# Altium PCB WorkingPoactuatorPCB.PcbDoc (part 2 of 2)
Units mil, origin at the board's own origin, x right, y up, seen from the top; angles counter-clockwise.
Board outline 7000 x 5000 mil, 2 copper layers (Top Layer, Bottom Layer), stack 64.961 mil thick; 132 components, 96 nets, 510 pads, 131 vias.
Unrouted connection lines stored in the file: 22.
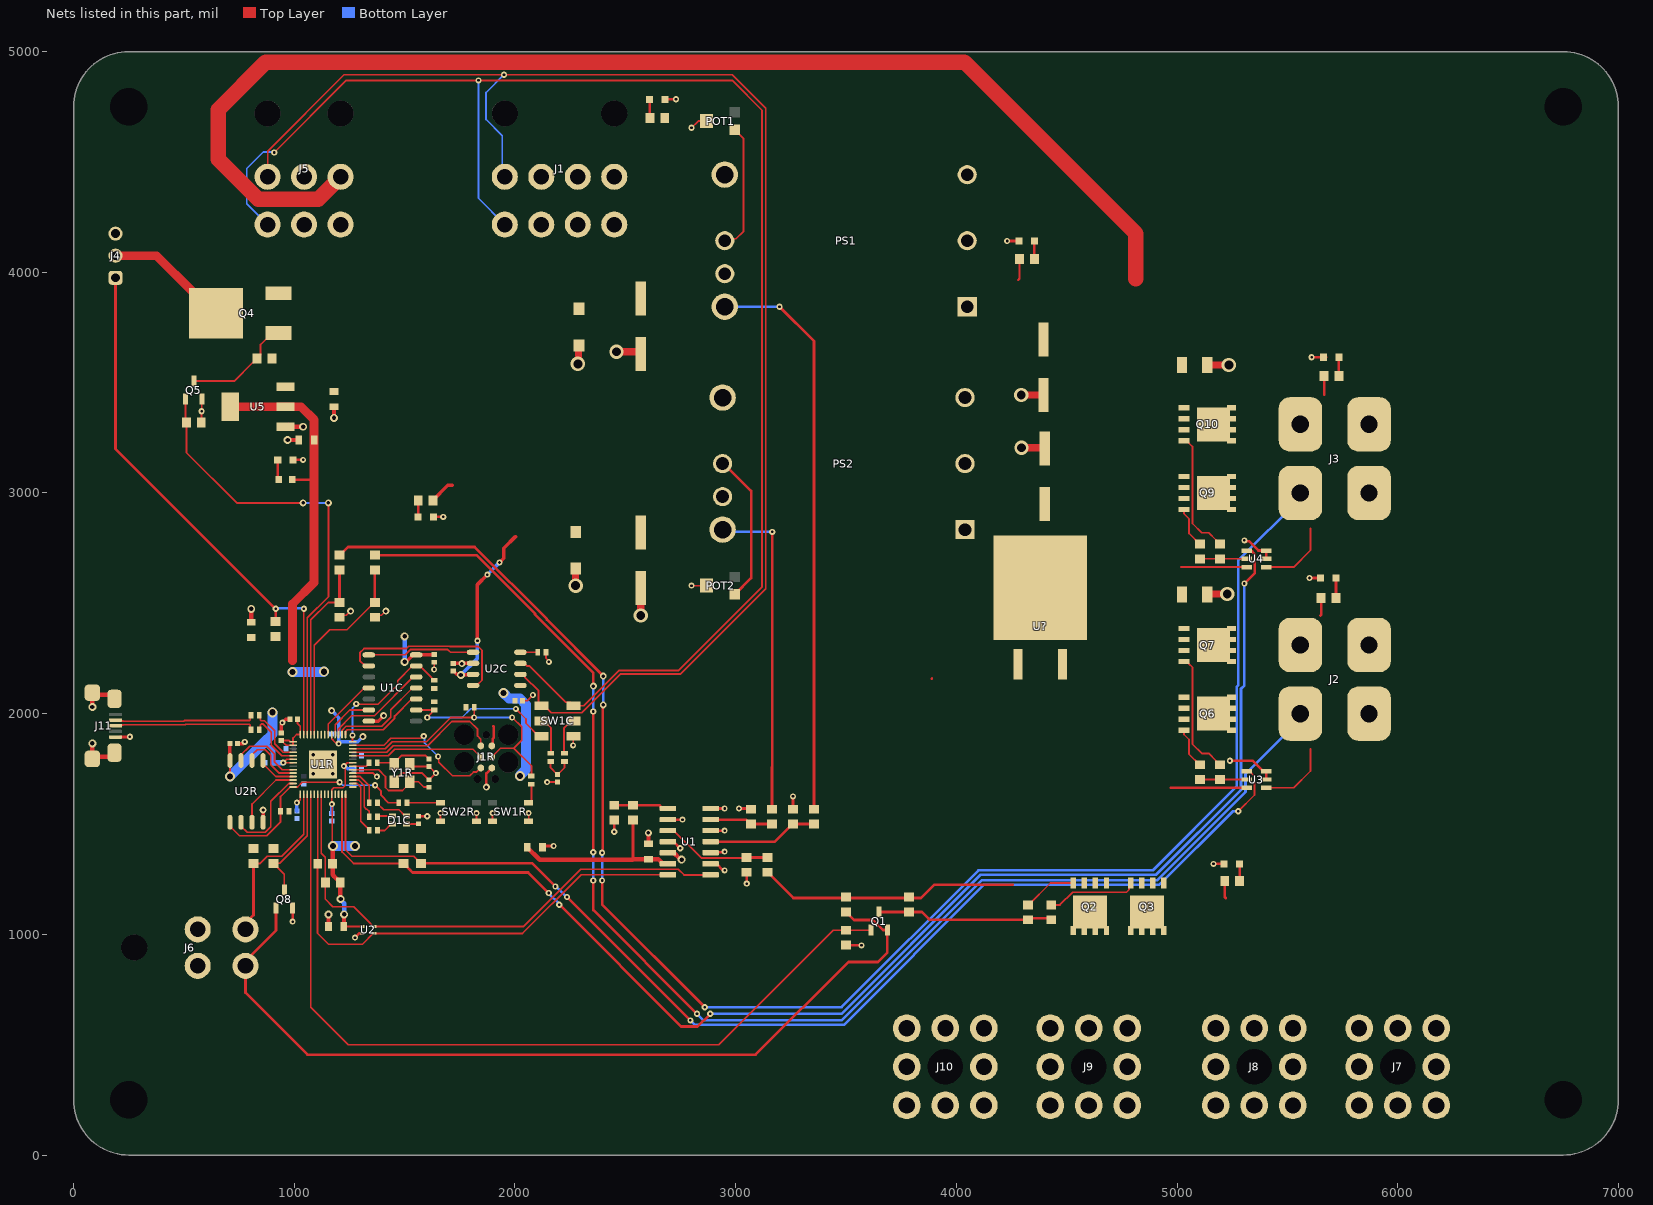
[diagram p2: the nets of this part, all layers, seen from the top]

## Via types
v1: diameter 28, hole 12, Top Layer to Bottom Layer, tented both sides, 52 vias
v2: diameter 27.56, hole 11.81, Top Layer to Bottom Layer, tented both sides, 32 vias
v3: diameter 31.5, hole 15.75, Top Layer to Bottom Layer, tented both sides, 18 vias
v4: diameter 36, hole 20, Top Layer to Bottom Layer, tented both sides, 13 vias
v5: diameter 45.28, hole 27.56, Top Layer to Bottom Layer, tented both sides, 8 vias
v6: diameter 65, hole 40, Top Layer to Bottom Layer, tented both sides, 8 vias

## Nets (pads, with @x,y where several pads share a name; then routed paths per layer and width w, separated by ;. In a path a pad name is that pad's centre, name@x,y a point inside that pad or via, vN(x,y) a via of type N, cw(c..) or ccw(c..) an arc to the next point about the centre after c; other vN are vias at no path point) (continued)
3V3: C1.1 C1C.1 C2.1 C3C.1 C3R.1 C4R.1 C5C.1 C5R.1 C6R.1 C7R.1 C8R.1 C9R.1 C10R.1 C12.1 C13.1 C14.1 D1C.4 J1R.2 R1.1 R1C.1 R4C.1 R4R.1 R5R.1 R9.1 R13.1 R14.1 R15.1 R19.1 R30.1 R35.1 R36.1 U1.6 U1C.14 U1R.1 U1R.10 U1R.22 U1R.33 U1R.42 U1R.43 U1R.44 U1R.48 U1R.49 U2.3 U2C.5 U2R.8 U5.2 U5.4 | length 6091.4
  Top Layer w7.87: C4R.1@941.02,1878.86 C4R.1@941.81,1878.86 ; U1R.49@994.67,1777.87 v2(949.88,1777.87) 965.63,1793.62 U1R.48@994.67,1793.62 ; v2(1011.89,1596.77) 1014.78,1596.77 1027.64,1609.63 U1R.1@1027.64,1634.67 ; C10R.1@1015,1975 1015,1955 1027.64,1942.36 U1R.42@1027.64,1905.33 1010.33,1905.33 994.67,1889.67 U1R.43@994.67,1872.36 ; U1R.33@1169.37,1905.33 1169.37,1885.52 1186.64,1868.25 1197.1,1868.25 v2(1200.87,1864.49) ; v5(1175,1400) 1172.5,1402.5 1172.5,1587.5 v2(1170,1590) 1169.37,1590.63 U1R.10@1169.37,1634.67 1169.37,1654.48 1178.6,1663.7 1194.84,1663.7 1220.55,1663.7 1231.03,1674.18 1231.03,1750.26 1224.49,1756.8 v2(1224.49,1762.13) 1240.24,1777.87 U1R.22@1265.33,1777.87 ; C1C.1@1633.44,2266.95 C1C.1@1633.94,2267.44 ; C4R.1@941.81,1878.86 948.9,1871.77 948.9,1870.98 963.27,1856.61 U1R.44@994.67,1856.61 U1R.43@994.67,1872.36 ; C4R.1@941.81,1878.86 974.88,1878.86 981.38,1872.36 U1R.43@994.67,1872.36
  Top Layer w8: v5@1155,1400 v5@1160,1395
  Top Layer w9.84: v5(708.54,1714.88) U2R.8@708.54,1787.66 ; v5(1135,2190) v5@1136.06,2191.06 ; D1C.4@1507.95,1500.32 1508.25,1500.61 1560.66,1500.61 C5C.1@1563.07,1498.2
  Top Layer w10: C2.1@1225,1035 1225.75,1035.75 U2.3@1307.44,1035.75 ; C5C.1@1563.07,1498.2 C5C.1@1563.07,1500.33
  Top Layer w11.81: J1R.2@1895.16,1853.86 1898.83,1857.53 1898.83,1885.29 1903.56,1890.02 1903.56,1941.32 1901.65,1943.23
  Top Layer w12: 993.5,3060 1090,3060 ; 2535,1340 R19.1@2535,1518
  Top Layer w15.75: U2R.8@708.54,1787.66 C3R.1@708.54,1864.49 ; v4(1500,2235) 1507.27,2235 1538.73,2266.46 U1C.14@1552.24,2266.46 ; U1C.14@1552.74,2266.95 C1C.1@1633.44,2266.95
  Top Layer w20: v5@1170,1390 1173.5,1386.5 R13.1@1173.5,1320 1173.5,1270.78 1179.37,1264.9 1179.37,1264.13 1196,1247.5 1198.5,1247.5 1208.5,1237.5 R14.1@1208.5,1235 1209.25,1234.25 1209.25,1160.75 v4(1210,1160) ; C2.1@1225.38,1036.12 1225.38,1089.75 v4(1225.75,1090.13) ; C13.1@2055,1395 2111.87,1338.13 2533.13,1338.13 2535,1340 C1.1@2605,1340 2650,1340 2665.94,1324.06 2665.94,1321.81 2667.76,1320 U1.6@2693.35,1320
  Top Layer w40: U5.4@710,3390.59 U5.2@960,3390.59 1030.59,3390.59 1090,3331.17 C12.1@1090,3240 1090,3060 1090,2595 991.97,2496.97 991.97,2240
  Bottom Layer w15.75: C7R.1@1011.89,1558.78 v2(1011.89,1596.77) ; C6R.1@1169.37,1547.13 1169.69,1547.44 1169.69,1589.69 v2(1170,1590) ; v3(1169.37,2014.09) 1202.24,1981.22 C9R.1@1202.24,1907.8 1201.56,1907.11 v2@1201.56,1872.36 ; v2(1200.87,1864.49) 1208.74,1872.36 1251.23,1872.36 1251.63,1871.97 1287.09,1871.97 v3(1311.1,1895.98) ; v2(1224.49,1762.13) 1229.82,1762.13 1241.73,1750.21 C8R.1@1270.35,1750.21
  Bottom Layer w20: v4(1210,1160) 1210,1156.03 1225.75,1140.28 v4(1225.75,1090.13) v4@1225.75,1086.76 ; v4(1500,2235) v4(1500,2350)
  Bottom Layer w23.62: 864.15,1870.49 903.03,1831.61 C5R.1@903.03,1777.87 v2(949.88,1777.87)
  Bottom Layer w45.28: v5(708.54,1714.88) 864.15,1870.49 901.65,1907.99 v5(901.65,2006.22) ; v5(991.97,2188.19) 1133.19,2188.19 v5(1135,2190) ; v5(1175,1400) v5(1275,1400) ; v5(1948.9,2092.83) 1972.72,2069.02 2022.36,2069.02 2049.3,2042.08 2049.3,1746.08 2021.97,1718.75 v5(2021.97,1718.19)
3V3_MEAS: R19.2 R23.1 U1.1 | length 250.7
  Top Layer w12: R23.1@2450,1585 R19.2@2535,1585 ; R19.2@2535.16,1585 2654.92,1585 2661.94,1577.97 2661.94,1575.81 2667.76,1570 U1.1@2693.35,1570
5V: C4C.1 C8.1 C9.1 C11.1 J1.6 J5.5 PS2.7 PS2.8 Q4.2 R3.1 R18.1 R24.1 U2C.3 U5.3 | length 2414.3
  Top Layer w12: R18.1@3165,1565.82 R18.1@3165,1567 3165,1757.85 3165.93,1758.78 v1(3165.93,2823.82)
  Top Layer w15.75: R3.1@1628.5,2965 1628.5,2967.5 1696,3035 1715,3035 ; C4C.1@1720.55,2193.82 1723.7,2190.67 1724.49,2190.67 1736.28,2178.88 1751.12,2178.88 v4(1755,2175) 1756.56,2176.56 1808.61,2176.56 U2C.3@1810.12,2178.07 ; v1(1830,2330) 1830,2585 v1(1875,2630) ; v1(1930,2685) 1950,2705 1950,2750 2002.66,2802.66
  Bottom Layer w12: PS2.8@2955.79,2823.82 v1(3165.93,2823.82)
  Bottom Layer w15.75: v4(1755,2175) 1830,2250 v1(1830,2330) ; v1(1875,2630) v1(1930,2685)
5V_MEAS: R18.2 R22.1 U1.13 | length 286.6
  Top Layer w12: U1.13@2886.65,1520 3047.5,1520 3067.5,1500 R22.1@3070,1500 R18.2@3165,1500
15V: C4.1 C5.1 J1.7 J1.8 J5.6 PS1.7 PS1.8 R2.1 R17.1 | length 2587.1
  Top Layer w12: v1(3198.82,3843.82) 3355,3687.64 R17.1@3355,1569.4
  Bottom Layer w12: PS1.8@2950.79,3843.82 v1(3198.82,3843.82)
15V_MEAS: R17.2 R21.1 U1.11 | length 501.5
  Top Layer w12: U1.11@2886.65,1420 3177.5,1420 3257.5,1500 R21.1@3260,1500 R17.2@3355,1500
AUX_SWITCH: J6.4 R15.2 U1R.2 | length 778.1
  Top Layer w7.87: J6.4@778.94,1022.68 J6.4@778.94,1050.77 ; R15.2@815,1321.5 845.8,1321.5 870.69,1346.39 877.61,1353.31 943.31,1353.31 1043.39,1453.39 U1R.2@1043.39,1634.67
  Top Layer w12: J6.4@778.94,1050.77 815,1086.83 R15.2@815,1321.5
CANCLK_RP2CAN: U1C.6 U1R.32 | length 224.8
  Top Layer w7.87: U1R.32@1185.12,1905.33 1185.12,1950.12 1251.46,2016.46 U1C.6@1337.68,2016.46
CANH: J1.5 J5.4 SW1C.4 U2C.7 | length 7110.8
  Top Layer w8: v1(909.35,4542.76) 1235.97,4869.38 2983.81,4869.38 3119.94,4733.25 3119.94,2574.94 2740,2195 2470.6,2195 2311.35,2035.75 SW1C.4@2265.83,2035.75 2250.08,2051.5 2229.8,2051.5 2064.98,2216.32 2053.9,2216.32 2042.16,2228.07 U2C.7@2024.68,2228.07
  Bottom Layer w8: J5.4@879.29,4216.06 785,4310.35 785,4470 860,4545 907.11,4545 v1(909.35,4542.76) ; v1(1835,4869.38) 1835,4335 J1.5@1953.94,4216.06
CANL: J1.1 J5.1 SW1C.1 U2C.6 | length 6739.2
  Top Layer w8: J5.1@879.29,4432.6 879.29,4549.29 1225.25,4895.25 v1(1950,4895.25) ; v1@1950.25,4895.25 2984.75,4895.25 3136.79,4743.21 3136.79,2566.79 2749.13,2179.13 2477.18,2179.13 2302.24,2004.19 2163.53,2004.19 2131.97,2035.75 SW1C.1@2120.16,2035.75 ; U2C.6@2024.68,2178.07 2037.19,2178.07 2044.41,2170.85 2044.41,2165.72 2106.95,2103.18 2106.95,2049.62 SW1C.1@2120.16,2036.41
  Bottom Layer w7.87: v1(1950,4895.25) 1869.14,4814.4 1869.14,4692.03 1942.14,4619.04 1942.14,4444.4 J1.1@1953.94,4432.6
CANRX_RP2CAN: U1C.2 U2C.4 | length 845.6
  Top Layer w7.87: U1C.2@1337.68,2216.46 1320.94,2216.46 1297.32,2240.08 1297.32,2276.24 1316.27,2295.19 1508.57,2295.19 1519.4,2306.02 1702.09,2306.02 1703.93,2304.19 1834.14,2304.19 1850.47,2287.86 1850.47,2151.69 1826.85,2128.07 U2C.4@1810.12,2128.07
CANTX_RP2CAN: U1C.1 U2C.1 | length 487.4
  Top Layer w7.87: U1C.1@1337.68,2266.46 1502.11,2266.46 1525.92,2290.28 1695.57,2290.28 1707.77,2278.07 U2C.1@1810.12,2278.07
DBG_TX_RP2040: J1R.5 U1R.27 | length 714.8
  Top Layer w7.87: U1R.27@1265.33,1856.61 1406.33,1856.61 1437.82,1888.11 1572.24,1888.11 1582.08,1897.95 v2(1586.69,1897.95) ; v2(1651.65,1805.8) 1654.8,1802.66 1654.8,1780.63 1717.01,1718.42 1795.19,1718.42 1812.07,1735.3 1825.1,1735.3 1843.66,1753.86 J1R.5@1845.16,1753.86
  Bottom Layer w7.87: v2(1586.69,1897.95) 1590.42,1894.22 1590.42,1867.04 v2(1651.65,1805.8)
FAN_PWR: J4.2 Q4.3 | length 639.2
  Top Layer w40: J4.2@190,4075 375.5,4075 541.5,3909 543.5,3909 601.5,3851 601.5,3849 Q4.3@695.5,3755
FAN_SWITCH: Q5.1 R29.1 U1R.40 | length 2074.1
  Top Layer w7.87: U1R.40@1059.13,1905.33 1059.13,2434.13 1155,2530 v3(1155,2955) v3@1155,2957.85
  Top Layer w8: Q5.1@507.5,3425 507.5,3324 R29.1@511.5,3320 511.5,3182.5 739,2955 v3(1040,2955)
  Bottom Layer w8: v3(1040,2955) v3(1155,2955)
FAN_TACH: J4.1 R30.2 U1R.41 | length 2561.3
  Top Layer w7.87: U1R.41@1043.39,1905.33 1043.39,2396.82 v1(1043.39,2475) v1@1043.39,2478.39
  Top Layer w12: J4.1@190,3975 190,3200 v1@915.46,2474.54 ; R30.2@915,2417 915.92,2417.92 v1(915.92,2475)
  Bottom Layer w12: v1(915.92,2475) 918.42,2477.5 1042.5,2477.5 v1@1043.39,2478.39
GND: C1.2 C1C.2 C1R.2 C2.2 C2C.1 C2R.2 C3.2 C3C.2 C3R.2 C4.2 C4C.2 C4R.2 C5.2 C5C.2 C5R.2 C6.2 C6R.2 C7.2 C7R.2 C8.2 C8R.2 C9.2 C9R.2 C10.2 C10R.2 C11.2 C11R.2 C12.2 C12R.2 C13.2 C13R.2 C14.2 D1.2 D2.2 D3.2 D4.2 D5.2 D6.2 D7.2 J1.2 J1.3 J1.4 J1R.6 J2.3 J2.4 J3.3 J3.4 J4.3 J5.2 J6.1 J6.2 J9.1 J10.1 J11.5 J11.6 J11.7 J11.8 J11.9 POT1.2 POT2.2 PS1.2 PS1.3 PS1.4 PS2.2 PS2.3 PS2.4 Q5.2 Q8.2 R6C.2 R8.1 R20.2 R21.2 R22.2 R23.2 R27.2 R28.2 R29.2 SW1C.6 SW1R.B1 SW1R.B2 SW2R.B1 SW2R.B2 U1.2 U1.4 U1.5 U1.9 U1.10 U1.12 U1.14 U1C.7 U1R.19 U1R.57 U2.4 U2C.2 U2R.4 U3.2 U3.3 U4.2 U4.3 U5.1 Y1R.2 Y1R.4 | length 4872.8
  Top Layer w7.87: v3(1173.31,1726.69) U1R.57@1177.24,1730.63 ; U1R.19@1265.33,1730.63 1358.35,1730.63 v2(1374.09,1714.88) ; SW2R.B1@1662.48,1512.13 v2(1662.48,1549.53) ; SW2R.B2@1825.87,1512.13 v2(1825.87,1549.53) ; SW1R.B1@1898.58,1515.87 1898.7,1515.98 v2(1898.7,1549.53) ; C3C.2@2034.09,2058.19 2034.56,2058.65 2056.45,2058.65 2081.29,2083.5 v2(2081.29,2084.34) ; SW1R.B2@2062.09,1512.13 v2(2062.09,1549.53) ; R6C.2@2140.83,2278.07 2140.83,2251.5 2153.62,2238.7 v2(2153.62,2234.57) ; v2(2145.75,1689.88) C2C.1@2192.99,1689.88 ; v2(2263.86,1856.61) 2263.86,1895.98 SW1C.6@2265.83,1897.95 ; v1(2800,2580) POT2.2@2867.91,2580 ; v1(2800,4655) 2830,4685 POT1.2@2867.91,4685
  Top Layer w8: v1(580,3370) 581.25,3371.25 581.25,3423.75 Q5.2@582.5,3425 ; U5.1@974.69,3314.72 U5.1@989.41,3300 ; R28.2@1205,2436.5 1213.88,2445.38 1235.38,2445.38 v3(1255,2465) ; R27.2@1365,2436.5 1373.88,2445.38 1395.38,2445.38 v3(1415,2465) ; Y1R.4@1453.7,1691.26 1453.7,1697.17 1487.23,1730.69 1579.35,1730.69 1609.53,1700.51 C1R.2@1610.32,1700.51 1611.1,1700.51 v2@1641.22,1730.63 ; Y1R.2@1523.7,1771.26 1534.21,1760.75 C2R.2@1610.32,1760.75 1611.1,1760.75 v2@1641.22,1730.63 ; v2(1633.94,2200.32) C1C.2@1633.94,2233.19 C1C.2@1633.94,2235.32 ; v2(1641.81,1730.63) v2@1641.22,1730.63 ; SW1R.B1@1898.58,1515.87 SW1R.B1@1901.26,1513.19 ; U3.2@5405,1701.5 U3.2@5405.75,1700.75 ; U4.2@5405,2701.5 U4.2@5405.75,2700.75
  Top Layer w9.84: C5C.2@1563.07,1535.16 v2(1602.44,1535.16)
  Top Layer w10: R29.2@578.5,3320 580,3321.5 v1(580,3370)
  Top Layer w11.81: v3(1870.24,1667.32) 1870.24,1728.94 J1R.6@1895.16,1753.86
  Top Layer w12: J11.5@210.32,1893.82 210.91,1894.41 254.41,1894.41 v1(255,1895) ; v1(992.5,1057.5) Q8.2@992.5,1119 ; D1.2@995,3150 v1(1040,3150) ; v1(1275,985) 1294.25,1004.25 U2.4@1307.44,1004.25 ; D2.2@1625,2891.54 D2.2@1631.5,2891.54 v1(1675,2891.54) ; C13.2@2125,1400 v1(2175,1400) ; v1(2450,1465) R23.2@2450,1518 ; D3.2@2680,4783.72 v1(2730,4783.72) ; U1.5@2693.35,1370 U1.5@2718.94,1370 ; U1.4@2693.35,1420 2718.94,1420 v1(2748.94,1390) ; U1.2@2693.35,1520 v1@2755,1520 ; U1.9@2886.65,1320 2912.24,1320 2942.24,1290 v1@2945,1290 ; U1.10@2886.65,1370 2889.15,1372.5 2947.5,1372.5 v1(2950,1375) ; U1.12@2886.65,1470 v1(2950,1470) ; U1.14@2886.65,1570 v1(2950,1570) ; v1(3015,1570) 3067,1570 R22.2@3070,1567 ; v1(3050,1230) R20.2@3050,1281.5 ; R21.2@3260,1567 v1(3260,1625) ; R8.1@3500,951.5 3501.5,950 v1(3570,950) ; v1(4230,4141.92) D4.2@4280,4141.92 ; v1(5165,1319.1) D7.2@5213.5,1319.1 D7.2@5215,1319.1 ; v1(5239.37,1786.94) 5342.96,1786.94 5390.45,1739.45 U3.3@5405,1739.45 ; v1(5305,2785) 5308.06,2781.94 5325.58,2781.94 5368.07,2739.45 U4.3@5405,2739.45 ; U3.2@5405,1701.5 U3.3@5405,1738.9 ; U4.2@5405,2701.5 U4.3@5405,2738.9 ; v1(5600,2615) D6.2@5650.03,2615 ; v1(5610,3615) D5.2@5663.5,3615 D5.2@5675,3615
  Top Layer w15.75: C3R.2@742.8,1864.49 767.8,1864.49 v2(775.67,1872.36) ; U2R.4@858.54,1508.13 v3(858.54,1563.41) ; C4R.2@941.02,1913.11 941.02,1950.86 945.94,1955.78 v2(945.94,1958.98) 961.69,1974.72 980.47,1974.72 C10R.2@980.75,1975 ; U1C.7@1337.68,1966.46 1380.52,1966.46 v3(1405.06,1991) ; C4C.2@1720.55,2228.07 1721.24,2227.38 1759.23,2227.38 v3(1759.92,2226.69) 1760.61,2227.38 1809.43,2227.38 U2C.2@1810.12,2228.07
  Top Layer w20: J11.8@85,1795.39 v4(85,1865) ; v4(85,2030) 85,2074.61 95.39,2085 167.44,2085 J11.6@185.39,2067.05 ; J11.8@105,1795.39 105,1800.15 109.85,1805 167.44,1805 J11.7@185.39,1822.95 ; C14.2@805,2415 v4(805,2475) ; v4(970,3240) C12.2@1020,3240 ; U5.1@989.42,3300.02 v4(1040,3300) ; C2.2@1155,1035 v4(1155,1090) ; v4(1180,3340) C11.2@1180,3390 ; C1.2@2605,1410 v3(2605,1460) ; U1.5@2718.94,1370 2747.33,1341.61 2751.88,1341.61 v4@2754.94,1338.55
  Top Layer w32: v6(2275,2580) C8.2@2275,2657 ; v6(2285,3585) 2287.5,3587.5 2287.5,3658.5 C4.2@2290,3661 ; v6(2460,3640) C5.2@2570,3640 ; v6(2570,2445) C9.2@2570,2569 ; v6(4294,3444) C3.2@4395,3444 ; v6(4295,3205) 4396,3205 C7.2@4400,3201 ; C6.2@5134.35,2542.5 v6(5227.5,2542.5) ; C10.2@5137.48,3580 v6(5235,3580)
  other v1: 2950,1290 2759,1520
  other v3: 1086.69,1726.69 1086.69,1813.31 1173.31,1813.31
  other v4: 2755,1338.55
INT_RP2CAN: U1C.4 U1R.34 | length 297.2
  Top Layer w7.87: U1R.34@1153.62,1907.8 1153.62,1953.4 1316.68,2116.46 U1C.4@1337.68,2116.46
KILL_SWITCH: J6.3 Q1.2 Q8.1 R37.2 | length 3980.2
  Top Layer w12: Q8.1@917.5,1119 917.5,1017.5 778.94,878.94 J6.3@778.94,857.32 778.94,736.06 1060,455 3091,455 3511,875 3644.63,875 3687.63,918 3687.63,1019.37 3667.75,1019.37 3622.12,1065 3536.5,1065 R37.2@3500,1101.5
LEDB_RP2CAN: R8C.1 U1R.18 | length 168.1
  Top Layer w7.87: U1R.18@1265.33,1714.88 1298.19,1714.88 1339.65,1673.43 R8C.1@1339.65,1596.77
LEDG_RP2CAN: R7C.1 U1R.17 | length 213.3
  Top Layer w7.87: U1R.17@1265.33,1699.13 1291.67,1699.13 1317.01,1673.79 1317.01,1577.12 1326.86,1567.26 1329.79,1567.26 1339.65,1557.4 R7C.1@1339.65,1533.78
LEDR_RP2CAN: R5C.1 U1R.16 | length 255
  Top Layer w7.87: U1R.16@1265.33,1683.39 1285.14,1683.39 1301.26,1667.27 1301.26,1513.11 1339.65,1474.72 R5C.1@1339.65,1470.79
MISO_RP2CAN: U1C.12 U1R.31 | length 475
  Top Layer w7.87: U1R.31@1200.87,1905.33 1200.87,1931.67 1259.28,1990.08 1363.4,1990.08 1539.77,2166.46 U1C.12@1552.24,2166.46
MOSI_RP2CAN: U1C.11 U1R.30 | length 454.6
  Top Layer w7.87: U1R.30@1216.61,1905.33 1216.61,1925.14 1234.3,1942.83 1395.87,1942.83 1437.09,1984.05 1437.09,2018.03 1535.51,2116.46 U1C.11@1552.24,2116.46
MOTOR_EN: Q1.3 R10.2 R11.1 R12.1 | length 799.9
  Top Layer w12: Q1.3@3650,1101.5 R10.2@3785,1101.5 3843.5,1101.5 3878.5,1066.5 R11.1@4325,1066.5 4331.5,1073 4423.5,1073 R12.1@4430,1066.5
MOTOR_PWR: J7.1 J8.1 Q2.D Q3.D R7.1 | length 77.3
  Top Layer w12: R7.1@5216.5,1240.9 5216.5,1168.5 5220,1165
nCS_RP2CAN: R4C.2 U1C.13 U1R.28 | length 646.2
  Top Layer w7.87: v2(1263.86,1901.5) 1263.86,1872.36 U1R.28@1265.33,1872.36 ; v2(1280.81,2044.39) 1282.36,2042.83 1379.21,2042.83 1468.32,2131.94 1468.32,2149.27 1535.51,2216.46 U1C.13@1552.24,2216.46 1568.98,2216.46 1623.11,2162.32 1623.11,2157.8 1630,2150.91 R4C.2@1633.94,2150.91
  Bottom Layer w7.87: v2(1263.86,1901.5) 1263.86,2025.15 1280.81,2042.1 v2(1280.81,2044.39)
NetC2C_2: C2C.2 R2C.2 R3C.2 | length 144.3
  Top Layer w7.87: R2C.2@2161.5,1782.8 2161.5,1754.84 2192.2,1724.13 C2C.2@2192.99,1724.13 2193.78,1724.13 2224.49,1754.84 R3C.2@2224.49,1782.8
NetC2R_1: C2R.1 R1R.2 Y1R.3 | length 263.4
  Top Layer w8: R1R.2@1375.99,1777.87 1447.09,1777.87 Y1R.3@1453.7,1771.26 1453.7,1777.17 1487.23,1810.69 1593.83,1810.69 1609.53,1795 C2R.1@1610.32,1795
NetD1_1: D1.1 R1.2 | length 90.6
  Top Layer w12: D1.1@925,3150 925,3061.5 926.5,3060
NetD1C_1: D1C.1 R5C.2 | length 80.1
  Top Layer w7.87: R5C.2@1377.05,1470.79 1410.51,1470.79 1440.04,1500.32 D1C.1@1444.96,1500.32
NetD1C_2: D1C.2 R7C.2 | length 68.7
  Top Layer w7.87: R7C.2@1377.05,1533.78 1379.02,1535.75 D1C.2@1444.96,1535.75
NetD1C_3: D1C.3 R8C.2 | length 158.5
  Top Layer w7.87: R8C.2@1377.05,1596.77 1377.05,1592.83 1405.59,1564.29 1474.49,1564.29 1503.03,1535.75 D1C.3@1507.95,1535.75
NetD2_1: D2.1 R3.2 | length 73.5
  Top Layer w12: D2.1@1561.5,2891.54 R3.2@1561.5,2965
NetD3_1: D3.1 R2.2 | length 74.3
  Top Layer w8: R2.2@2610,4711.5 R2.2@2611.5,4710
  Top Layer w12: R2.2@2610,4711.5 D3.1@2610,4783.72
NetD4_1: D4.1 R4.2 | length 81.9
  Top Layer w12: R4.2@4353.5,4060 D4.1@4353.5,4141.92
NetD5_1: D5.1 R5.2 | length 85
  Top Layer w12: R5.2@5733.5,3530 D5.1@5733.5,3615
NetD6_1: D6.1 R6.2 | length 90
  Top Layer w12: R6.2@5720.03,2525 D6.1@5720.03,2615
NetD7_1: D7.1 R7.2 | length 78.2
  Top Layer w12: R7.2@5283.5,1240.9 D7.1@5283.5,1319.1
NetPOT1_1: POT1.1 PS1.6 | length 579.2
  Top Layer w7.87: POT1.1@2995.87,4645.63 3035.87,4605.63 3035.87,4570
  Top Layer w8: PS1.6@2950.79,4143.03 2959.26,4151.51 3001.51,4151.51 3035.87,4185.87 3035.87,4570
NetPOT2_1: POT2.1 PS2.6 | length 660.4
  Top Layer w12: PS2.6@2955.79,3123.03 3070,3008.82 3070,2614.76 POT2.1@2995.87,2540.63
NetQ2_4: Q2.4 R11.2 | length 246
  Top Layer w8: R11.2@4325,1133.5 4327.5,1133.5 4426.5,1232.5 Q2.4@4530,1232.5
NetQ3_4: Q3.4 R12.2 | length 414.2
  Top Layer w8: R12.2@4430,1133.5 4469.21,1133.5 4526.89,1191.19 4771.19,1191.19 4782.26,1202.26 4782.26,1224.76 Q3.4@4790,1232.5
NetQ4_1: Q4.1 Q5.3 R24.2 | length 501.5
  Top Layer w8: Q5.3@545,3507 728.5,3507 813,3591.5 815.5,3591.5 831.5,3607.5 R24.2@831.5,3610 847.5,3626 847.5,3672.5 900,3725 Q4.1@927.5,3725
NetQ6_4: Q6.4 R31.1 | length 185.2
  Top Layer w8: Q6.4@5031.44,1924.3 5031.44,1905.68 5054.13,1883 5054.13,1816.87 R31.1@5102.5,1768.5
NetQ7_4: Q7.4 R32.1 | length 510.7
  Top Layer w8: Q7.4@5053.5,2228.02 5053.5,2226.5 5070,2210 5070,1861.51 5111.51,1820 5143.5,1820 R32.1@5176.5,1787
NetQ9_4: Q9.4 R33.1 | length 188.7
  Top Layer w8: Q9.4@5030.75,2925 5031.44,2924.3 5031.44,2905.68 5054.13,2883 5054.13,2816.87 5102.5,2768.5 R33.1@5105,2768.5
NetQ10_4: Q10.4 R34.1 | length 562.7
  Top Layer w8: Q10.4@5032.5,3236.02 5045.5,3236.02 5053.5,3228.02 5053.5,3226.5 5070,3210 5070,2861.51 5111.51,2820 5143.5,2820 5176.5,2787 5176.5,2784.5 5192.5,2768.5 R34.1@5195,2768.5
NetR2C_1: R2C.1 SW1C.2 | length 172.3
  Top Layer w7.87: SW1C.2@2120.16,1966.85 2131.97,1966.85 2163.46,1935.35 2163.46,1822.17 R2C.1@2161.5,1820.2
NetR3C_1: R3C.1 SW1C.5 | length 172.3
  Top Layer w7.87: R3C.1@2224.49,1820.2 2222.52,1822.17 2222.52,1935.35 2254.02,1966.85 SW1C.5@2265.83,1966.85
NetR6C_1: R6C.1 U2C.8 | length 78.7
  Top Layer w7.87: U2C.8@2024.68,2278.07 R6C.1@2103.43,2278.07
NetR6R_1: R6R.1 SW1R.A2 | length 91.3
  Top Layer w7.87: SW1R.A2@2062.09,1596.77 2066.02,1596.77 2074.88,1605.63 R6R.1@2074.88,1680.43
NetR7R_1: R7R.1 SW2R.A1 | length 151.6
  Top Layer w7.87: R7R.1@1510.91,1596.77 SW2R.A1@1662.48,1596.77
NetR31_2: R31.2 R32.2 U3.5 | length 210
  Top Layer w8: R31.2@5105,1701.5 R32.2@5195,1701.5 U3.5@5315,1701.5
NetR33_2: R33.2 R34.2 U4.5 | length 219.7
  Top Layer w8: R33.2@5105,2701.5 R34.2@5195,2701.5 U4.5@5315,2701.5
  Top Layer w10: R33.2@5098.13,2694.63 R33.2@5105,2701.5
NetU1R_5: U1R.5
NetU1R_8: U1R.8
NetU1R_9: U1R.9
NetU1R_11: U1R.11
NetU1R_12: U1R.12
NetU1R_15: U1R.15
NetU1R_35: U1R.35
NetU1R_36: U1R.36
NetU1R_37: U1R.37
PHYS_KILLSWITCH: Q8.3 R9.2 U1R.3 | length 535.1
  Top Layer w7.87: Q8.3@955,1201 955,1271.5 R9.2@905,1321.5 905.93,1322.43 934.7,1322.43 1059.13,1446.86 U1R.3@1059.13,1634.67
PORT_MEAS: R25.2 R27.1 U1R.38 | length 907.6
  Top Layer w7.87: U1R.38@1090.63,1905.33 1090.63,2310.63 1159.97,2379.97 1238.97,2379.97 1362.5,2503.5 R27.1@1365,2503.5
  Top Layer w12: R27.1@1365,2503.5 R25.2@1365,2651.5
PORT_STAT: R36.2 U1R.14 U3.4 | length 5260.6
  Top Layer w7.87: U1R.14@1232.36,1634.67 1232.36,1382.64 1261.69,1353.31 1540.69,1353.31 1572.5,1321.5 R36.2@1575,1321.5 ; v1(5277.21,1557.79) 5350.81,1631.39 5350.81,1717.09 5329,1738.9 U3.4@5315,1738.9
  Top Layer w12: R36.2@1575,1321.5 2078.5,1321.5 v1(2182.96,1217.04) ; v1(2235.8,1169.2) v1(2795,610)
  Bottom Layer w12: v1(2182.96,1217.04) 2185.46,1217.04 2233.3,1169.2 v1(2235.8,1169.2) ; v1@2795.11,609.89 2795.98,609.89 2815.87,590 3490,590 4125,1225 4920,1225 5252.79,1557.79 v1(5277.21,1557.79)
QSPI_SCLK_RP2040: U1R.52 U2R.6 | length 286.6
  Top Layer w7.87: U2R.6@808.54,1791.65 808.54,1813.31 832.17,1836.93 868.33,1836.93 893.78,1811.48 893.78,1768.82 931.97,1730.63 U1R.52@994.67,1730.63
QSPI_SD0_RP2040: U1R.53 U2R.5 | length 178.4
  Top Layer w7.87: U2R.5@858.54,1791.65 858.54,1773.74 917.4,1714.88 U1R.53@994.67,1714.88
QSPI_SD1_RP2040: U1R.55 U2R.2 | length 427.3
  Top Layer w7.87: U2R.2@758.54,1512.13 758.54,1490.47 786.1,1462.91 798.7,1462.91 798.76,1462.86 868.33,1462.86 893.78,1488.31 893.78,1602.31 974.86,1683.39 U1R.55@994.67,1683.39
QSPI_SD2_RP2040: U1R.54 U2R.3 | length 309.4
  Top Layer w7.87: U2R.3@808.54,1512.13 808.54,1590.28 917.4,1699.13 U1R.54@994.67,1699.13
QSPI_SD3_RP2040: U1R.51 U2R.7 | length 339.2
  Top Layer w7.87: U2R.7@758.54,1791.65 758.54,1813.31 797.91,1852.68 874.85,1852.68 910.02,1817.51 910.02,1781.55 945.19,1746.38 U1R.51@994.67,1746.38
QSPI_SS_RP2040: R5R.2 R7R.2 U1R.56 U2R.1 | length 1007.5
  Top Layer w7.87: U2R.1@708.54,1512.13 708.54,1490.47 751.91,1447.11 874.85,1447.11 938.07,1510.33 R5R.2@938.07,1557.4 938.07,1624.33 U1R.56@981.38,1667.64 ; U1R.56@994.67,1667.64 1014.48,1667.64 1036.13,1689.29 v2(1205.44,1689.29) ; v2(1366.22,1675.51) 1393.35,1648.39 1393.35,1629.97 1426.55,1596.77 R7R.2@1473.5,1596.77
  Bottom Layer w7.87: v2(1205.44,1689.29) 1206.12,1689.29 1219.9,1675.51 v2(1366.22,1675.51)
RUN_RP2040: J1R.4 R4R.2 R6R.2 U1R.26 | length 1275.3
  Top Layer w7.87: U1R.26@1265.33,1840.87 1412.85,1840.87 1444.35,1872.36 1599.26,1872.36 1709.5,1982.6 v2(1815.04,1982.6) R4R.2@1815.04,2029.84 ; J1R.4@1895.16,1803.86 1934.72,1843.42 1995.19,1843.42 ; v2(1986.94,1982.6) 1988.27,1982.6 2030.59,1940.27 2030.59,1878.82 1995.19,1843.42 ; R6R.2@2074.88,1717.83 2074.88,1763.73 1995.19,1843.42
  Bottom Layer w7.87: v2(1815.04,1982.6) v2(1986.94,1982.6)
SCK_RP2CAN: U1C.10 U1R.29 | length 400.1
  Top Layer w7.87: U1R.29@1232.36,1905.33 1232.36,1918.62 1240.83,1927.09 1402.39,1927.09 1454.63,1979.32 1454.63,1989.08 1532,2066.46 U1C.10@1552.24,2066.46
SCL: R14.2 U1.8 U1R.7 U2.2 | length 2399.6
  Top Layer w7.87: U1R.7@1122.13,1634.67 1122.13,1367.87 1140,1350 1140,1235 1140,1160
  Top Layer w8: 1140,1160 1175,1125 1270,1125 1337.45,1057.55 1337.45,1056.92 1358.62,1035.75 U2.2@1362.56,1035.75 1363.31,1035 2037.52,1035 2297.52,1295 2740,1295 2765.81,1269.19 2885.84,1269.19 U1.8@2886.65,1270
SDA: R13.2 U1.7 U1R.6 U2.1 | length 2369.2
  Top Layer w7.87: 1106.38,1614.86 1106.38,1621.38 U1R.6@1106.38,1634.67
  Top Layer w8: R13.2@1105,1320 1105,1005 1155,955 1309.37,955 1358.62,1004.25 U2.1@1362.56,1004.25 2034.25,1004.25 2300,1270 U1.7@2693.35,1270 ; 1106.32,1614.77 1106.32,1351.32 1106.5,1351.14 R13.2@1106.5,1320
SOFTWARE_KILL_n: Q1.1 R8.2 U1R.4 | length 3786.6
  Top Layer w7.87: U1R.4@1074.88,1634.67 1074.88,1347.59 1074.69,1347.39 1074.69,1292.61 1074.88,1292.41 1074.88,670.12 1245,500 2924,500 3442.5,1018.5 R8.2@3500,1018.5 3556.5,1018.5 Q1.1@3611.5,1018.5
STBD_MEAS: R26.2 R28.1 U1R.39 | length 830.3
  Top Layer w7.87: U1R.39@1074.88,1905.33 1074.88,2425 1153.38,2503.5 R28.1@1205,2503.5
  Top Layer w12: R28.1@1205,2503.5 R26.2@1205,2651.5
STBD_STAT: R35.2 U1R.13 U4.4 | length 6227.8
  Top Layer w7.87: U1R.13@1216.61,1634.67 1216.61,1373.39 1268.5,1321.5 R35.2@1473.56,1321.5
  Top Layer w12: R35.2@1495,1321.5 1497.5,1321.5 1511.5,1307.5 1511.5,1305 1524.25,1292.25 1536.5,1280 2060,1280 v1(2152.96,1187.04) ; v1(2200.8,1134.2) 2752.87,582.13 2827.13,582.13 v1(2885,640) ; v1(5305,2590) 5352.87,2637.87 5352.87,2722.13 5340.1,2734.9 5319,2734.9 U4.4@5315,2738.9
  Bottom Layer w12: v1(2152.96,1187.04) 2152.96,1184.54 2200.8,1136.7 v1(2200.8,1134.2) ; v1(2885,640) 3480,640 4110,1270 4905,1270 5290,1655 5290,2112.84 5305,2127.84 v1(5305,2590)
SWCLK_RP2040: J1R.3 U1R.24 | length 606.9
  Top Layer w7.87: U1R.24@1265.33,1809.37 1425.9,1809.37 1455.82,1839.3 1809.72,1839.3 J1R.3@1845.16,1803.86
SWDIO_RP2040: J1R.1 U1R.25 | length 718.6
  Top Layer w7.87: U1R.25@1265.33,1825.12 1419.37,1825.12 1449.3,1855.04 1604.69,1855.04 1713.94,1964.3 1795.19,1964.3 1830.59,1928.89 1830.59,1898.96 1845.16,1884.4 J1R.1@1845.16,1853.86
TERM_DET_RP2CAN: R1C.2 SW1C.3 U1C.9 | length 723.9
  Top Layer w7.87: U1C.9@1552.24,2016.46 R1C.2@1630,2016.46 ; v2(1602.44,1982.6) 1623.11,2003.27 1623.11,2009.57 R1C.2@1630,2016.46 ; R1C.2@1633.94,2016.46 R1C.2@1630,2016.46 ; v2(2004.02,2021.97) 2050.09,1975.9 2050.09,1956.21 2108.35,1897.95 SW1C.3@2120.16,1897.95
  Bottom Layer w7.87: v2(1602.44,1982.6) 1759.92,1982.6 1799.29,2021.97 v2(2004.02,2021.97)
USB_N: J11.2 R3R.1 | length 637
  Top Layer w8: J11.2@190.32,1970.59 194.19,1966.72 223.54,1966.72 224.47,1965.8 499.26,1965.8 501.95,1968.49 795.63,1968.49 800.31,1973.17 800.31,1989.59 R3R.1@804.21,1993.49
USB_P: J11.3 R2R.1 | length 637
  Top Layer w8: J11.3@190.32,1945 194.19,1948.87 223.54,1948.87 224.47,1949.8 505.89,1949.8 508.58,1952.49 795.63,1952.49 800.31,1947.8 800.31,1931.38 R2R.1@804.21,1927.48
USB_RP2040_N: R3R.2 U1R.46 | length 267.4
  Top Layer w7.87: R3R.2@841.61,1993.49 845.34,1989.77 845.34,1972.97 849.95,1968.36 865.3,1968.36 910.94,1922.72 910.94,1863.44 949.26,1825.12 U1R.46@994.67,1825.12
USB_RP2040_P: R2R.2 U1R.47 | length 267.4
  Top Layer w7.87: R2R.2@841.61,1927.48 845.34,1931.2 845.34,1948 849.95,1952.61 858.78,1952.61 895.19,1916.2 895.19,1856.92 942.74,1809.37 U1R.47@994.67,1809.37
V+: J5.3 Q2.1 Q2.2 Q2.3 Q3.1 Q3.2 Q3.3 R4.1 R10.1 R16.1 R37.1 U?.1 U?.3 | length 6952.1
  Top Layer w10: 4280,3965 4286.5,3971.5 R4.1@4286.5,4060
  Top Layer w12: R16.1@3145,1281.5 3261.5,1165 3785,1165 3840,1165 3900,1225 4255,1225
  Top Layer w70: J5.3@1210,4432.6 1108.07,4330.67 837.07,4330.67 654.9,4512.84 654.9,4736.18 870.85,4952.13 4036.6,4952.13 4813.72,4175 4813.72,3970
V++: C6.1 C10.1 Q6.1 Q6.2 Q6.3 Q7.1 Q7.2 Q7.3 Q9.1 Q9.2 Q9.3 Q10.1 Q10.2 Q10.3 U3.6 U4.6 | length 644.2
  Top Layer w10: 3888.5,2158.5 3890,2160 ; 4970,1664.1 U3.6@5315,1664.1 ; 5017.87,2664.1 U4.6@5315,2664.1
V+_MEAS: R16.2 R20.1 U1.3 | length 477.1
  Top Layer w8: U1.3@2720,1470 2843.69,1346.32 3047.82,1346.32 R20.1@3050,1348.5
  Top Layer w12: R20.1@3050,1348.5 R16.2@3145,1348.5
VPORT: J2.1 J2.2 Q6.D Q7.D R6.1 R25.1 U3.1 | length 6750.2
  Top Layer w8: U3.1@5405,1664.1 5529.1,1664.1 5605,1740 5605,1840
  Top Layer w12: R25.1@1365,2718.5 1825.92,2718.5 2090.46,2453.96 2090.46,2449.54 2355,2185 v3(2355,2125) ; v1(2355,1244.13) 2355,1110 v1(2825,640) ; v1(2355,1371.87) v1(2355,2010) ; 5650,2445 5653.03,2448.03 R6.1@5653.03,2525
  Bottom Layer w12: v1(2355,1244.13) v1(2355,1371.87) ; v1(2355,2010) v3(2355,2125) ; v1(2825,640) 2855,610 3480,610 4115,1245 4910,1245 5310,1645 5310,1726.42 5558.98,1975.39 J2.1@5558.98,2000
Vreg: C3.1 C7.1 PS1.1 PS2.1 U?.2
VSTBD: J3.1 J3.2 Q9.D Q10.D R5.1 R26.1 U4.1 | length 7837.4
  Top Layer w8: U4.1@5405,2664.1 5529.1,2664.1 5605,2740 5605,2840
  Top Layer w12: R26.1@1205,2718.5 1207.5,2718.5 1244,2755 1817.53,2755 2144.2,2428.32 2144.2,2425.8 v3(2400,2170) ; v1(2395,1244.13) 2395,1135 v1(2860,670) ; v1(2395,1370) 2397.5,1372.5 2397.5,2037.5 v3(2400,2040) ; 5666.5,3446.5 R5.1@5666.5,3530
  Bottom Layer w12: v1(2395,1244.13) v1(2395,1370) ; v3(2400,2040) v3(2400,2170) ; v1(2860,670) 3480,670 4100,1290 4890,1290 5270.13,1670.13 5270.13,2121.07 5277.13,2128.07 5277.13,2693.54 5558.98,2975.39 J3.1@5558.98,3000
XIN_RP2040: C1R.1 U1R.20 Y1R.1 | length 443.1
  Top Layer w7.87: U1R.20@1265.33,1746.38 1381.97,1746.38 1413.46,1714.88 1413.46,1665.58 1427.16,1651.89 1490.24,1651.89 1523.7,1685.35 Y1R.1@1523.7,1691.26 1562.97,1691.26 1586.69,1667.54 1609.04,1667.54 C1R.1@1610.32,1666.26
XOUT_RP2040: R1R.1 U1R.21 | length 82.1
  Top Layer w7.87: U1R.21@1265.33,1762.13 1326.77,1762.13 1338.58,1773.94 R1R.1@1338.58,1777.87
pads on no net: J1. J1R.A J1R.B J1R.C J1R.D J1R.E J1R.F J1R.G J5. J6. J7.8 J8.8 J9.8 J10.8 J11.1 J11.4 POT1.3 POT2.3 SW1R.A1 SW2R.A2 U1C.3 U1C.5 U1C.8
copper on no net: | length 115.9
  Top Layer w12: 2640,4610 2678.5,4648.5 2678.5,4710

## Polygon pours and split planes (outlines as drawn)
VSTBD on Top Layer "VSTBD_L01_P023" (solid, pour order 23): 5675,3460 5085,3460 5085,2810 5675,2810
no net on Top Layer "NONET_L01_P029" (solid, pour order 29): 5675,2460 5085,2460 5085,1810 5675,1810
no net on Top Layer "NONET_L01_P033" (solid, pour order 33): 4890,4000 4890,2575 3880,2575 3880,3060 4500,3060 4500,3590 3880,3595.79 3880,4000
V++ on Top Layer "Top Layer-V+" (solid, pour order 21): 4910,2557.61 3877.54,2557.61 3877.54,1205 5060,1205 5060,4000 4910,4000
MOTOR_PWR on Top Layer "MOTOR_PWR_L01_P030" (solid, pour order 30): 4510,1185 4510,945 4960.6,494.4 4960.6,95 6325,95 6325,795 5675,1185
3V3 on Top Layer "3V3" (solid, pour order 28): 630,2380 2078.43,2380 2078.43,1365.98 630,1365.98
5V on Top Layer "Top Layer-5V" (solid, pour order 15): 3050,3179 2735,3494 2195,3494 2195,4295 2045,4295 2045,4127.5 1877.5,3960 1245,3960 1120,4085 1120,4285 965,4285 965,4020 865,4020 865,3430 1260,3430 1950,2740 3050,2740
15V on Top Layer "Top Layer-15V" (solid, pour order 11): 3045,4245 2660,4630 1475,4630 1130,4285 1130,4095 1720,4095 1925,4305 2210,4305 2210,3760 3045,3760
GND on Bottom Layer "GND" (solid, pour order 2): 0,250 0,4750 cw(c250,4750) 250,5000 6750,5000 cw(c6750,4750) 7000,4750 7000,250 cw(c6750,250) 6750,0 250,0 cw(c250,250)

## Keep-outs
Keep-Out Layer:
  region: 500,250 ccw(c250,250) 250,500 0,500 0,250 ccw(c250,250) 250,0 500,0
  region: 250,4500 ccw(c250,4750) 500,4750 500,5000 250,5000 ccw(c250,4750) 0,4750 0,4500
  region: 6500,4750 ccw(c6750,4750) 6750,4500 7000,4500 7000,4750 ccw(c6750,4750) 6750,5000 6500,5000
  region: 6750,500 ccw(c6750,250) 6500,250 6500,0 6750,0 ccw(c6750,250) 7000,250 7000,500
  lines w10: 0,250 ccw(c250,250) 250,0 6750,0 ccw(c6750,250) 7000,250 7000,4750 ccw(c6750,4750) 6750,5000 250,5000 ccw(c250,4750) 0,4750 0,250

## Other copper
Top Layer:
  pour cut-out: 860,3770 860,3680 1000,3680 1000,3770
  pour cut-out: 1111.75,1660.33 1111.97,1660.55 1111.97,1877.3 1059.36,1877.3 1032.04,1849.98 1032.04,1777.36 1016.97,1762.3 1016.97,1662.3
  pour cut-out: 1201.97,1767.42 1251.97,1717.42 1251.97,1672.42 1161.97,1672.42 1161.97,1707.42
  pour cut-out: 1541.97,2283.19 1331.97,2283.19 1326.97,2278.19 1326.97,2028.19 1466.97,2028.19 1556.97,2088.19
  pour cut-out: 1409.78,1647.5 1409.82,1647.47 1409.82,1627.07 1610.39,1628.19 1621.91,1639.71 1621.91,1644.36 1586.34,1644.36 1562.28,1668.41 1540.11,1668.41 1525.09,1653.4 1515.09,1653.4
  pour cut-out: 1912.54,1906.04 1908.49,1895.29 1908.49,1862.41 1914.54,1856.35 1944.54,1856.35 1944.54,1881.35 1934.54,1891.35
Bottom Layer:
  pour cut-out: 5459.9,3208.42 5454.15,3202.66 5454.15,3088.72 5663.81,3088.72 5658.05,3094.47 5658.05,3208.42
  pour cut-out: 2760,610 2760,10 2855,10 2855,692.31

## Silkscreen, mask and mechanical layers (free items; w line width, h text height)
Top Overlay:
  drawing of 58 lines, arcs and shapes, not listed
  text "15V Power" at 2575,4830 h35
  text "CANL" at 1484.31,4535 h35 r180
  text "GND" at 1709.56,4530.57 h35 r180.5
  text "GND" at 1599.69,4530.4 h35 r180.35
  text "GND" at 1825.59,4529.22 h35 r179.32
  text "GND" at 579.56,4515.57 h35 r180.5
  text "CANL" at 449.84,4515.43 h35 r180.35
  text "V+" at 710.59,4514.22 h35 r179.32
  text "CANH" at 1489.18,4425.15 h35 r180.11
  text "5V" at 1599.9,4417.62 h35 r180.11
  text "15V" at 1709.64,4417.96 h35 r180.41
  text "15V" at 1824.64,4417.96 h35 r180.41
  text "5V" at 584.64,4405.46 h35 r180.41
  text "15V" at 704.64,4405.46 h35 r180.41
  text "CANH" at 450.05,4400.14 h35 r180.11
  text "STACK LINK" at 758.75,4276.78 h60 r180
  text "CAMERA CAGE" at 1823.75,4261.78 h60 r180
  text "V+ Power" at 4225,4180 h35
  text "VSTBD" at 6642.5,3980 h54 r90
  text "GND" at 6767.5,3980 h54 r90
  text "GND" at 69.54,3859.64 h35 r270.41
  text "FAN" at 203.29,3834.63 h60 r270.41
  text "PWR" at 69.54,3739.64 h35 r270.41
  text "STBD Battery" at 5555,3645 h35
  text "TACH" at 74.83,3622.54 h35 r270.11
  text "STBD BATTERY" at 6449,3605 h84 r90
  text "VSTBD" at 6642.5,3580 h54 r90
  text "GND" at 6767.5,3580 h54 r90
  text "3V3 Power" at 805,2985 h35
  text "5v Power" at 1485,2815 h35
  text "Port Battery" at 5525,2640 h35
  text "TERM / ON" at 2114.68,2078.19 h40
  text "BOOT" at 1670.86,1433.67 h40
  text "RESET" at 1887.09,1433.67 h40
  text "Motor Power" at 5105,1355 h35
  text "VPORT" at 6627.5,1330 h54 r90
  text "GND" at 6752.5,1330 h54 r90
  text "PORT BATTERY" at 6434,955 h84 r90
  text "VPORT" at 6627.5,930 h54 r90
  text "GND" at 6752.5,930 h54 r90
  text "GND" at 572.5,722.5 h54 r270
  text "AUX" at 697.5,712.5 h54 r270
  text "SWITCH CONN" at 848.22,673.75 h60 r270
  text "ESC / GND" at 3860.09,660 h120
  text "ESC / PWR" at 5260.05,660 h120
  text "GND" at 593.75,433.75 h54 r270
  text "KILL" at 704.01,422.5 h54 r270
  text "The Underwater Robotics Team" at 1630,235 h60
  text "'.ProjectTitle'" at 1630,110 h60
  text "v'.BoardRevision'" at 3060.06,110 h60
Bottom Overlay:
  drawing of 41 lines, arcs and shapes, not listed

## Text inside footprints (layer, text, board x,y; h text height)
U?: Top Overlay "*" at 4115,2205 h50; Mechanical 13 "*" at 4267.5,2332 h50